# Altium PCB PCB4270Z_A00.PcbDoc (part 3 of 3)
Units mm, origin at the board's own origin, x right, y up, seen from the top; angles counter-clockwise.
Board outline 32 x 51 mm, 4 copper layers (Top Layer, Signal Layer 2, Signal Layer 3, Bottom Layer), stack 1.6 mm thick; 106 components, 90 nets, 404 pads, 564 vias.
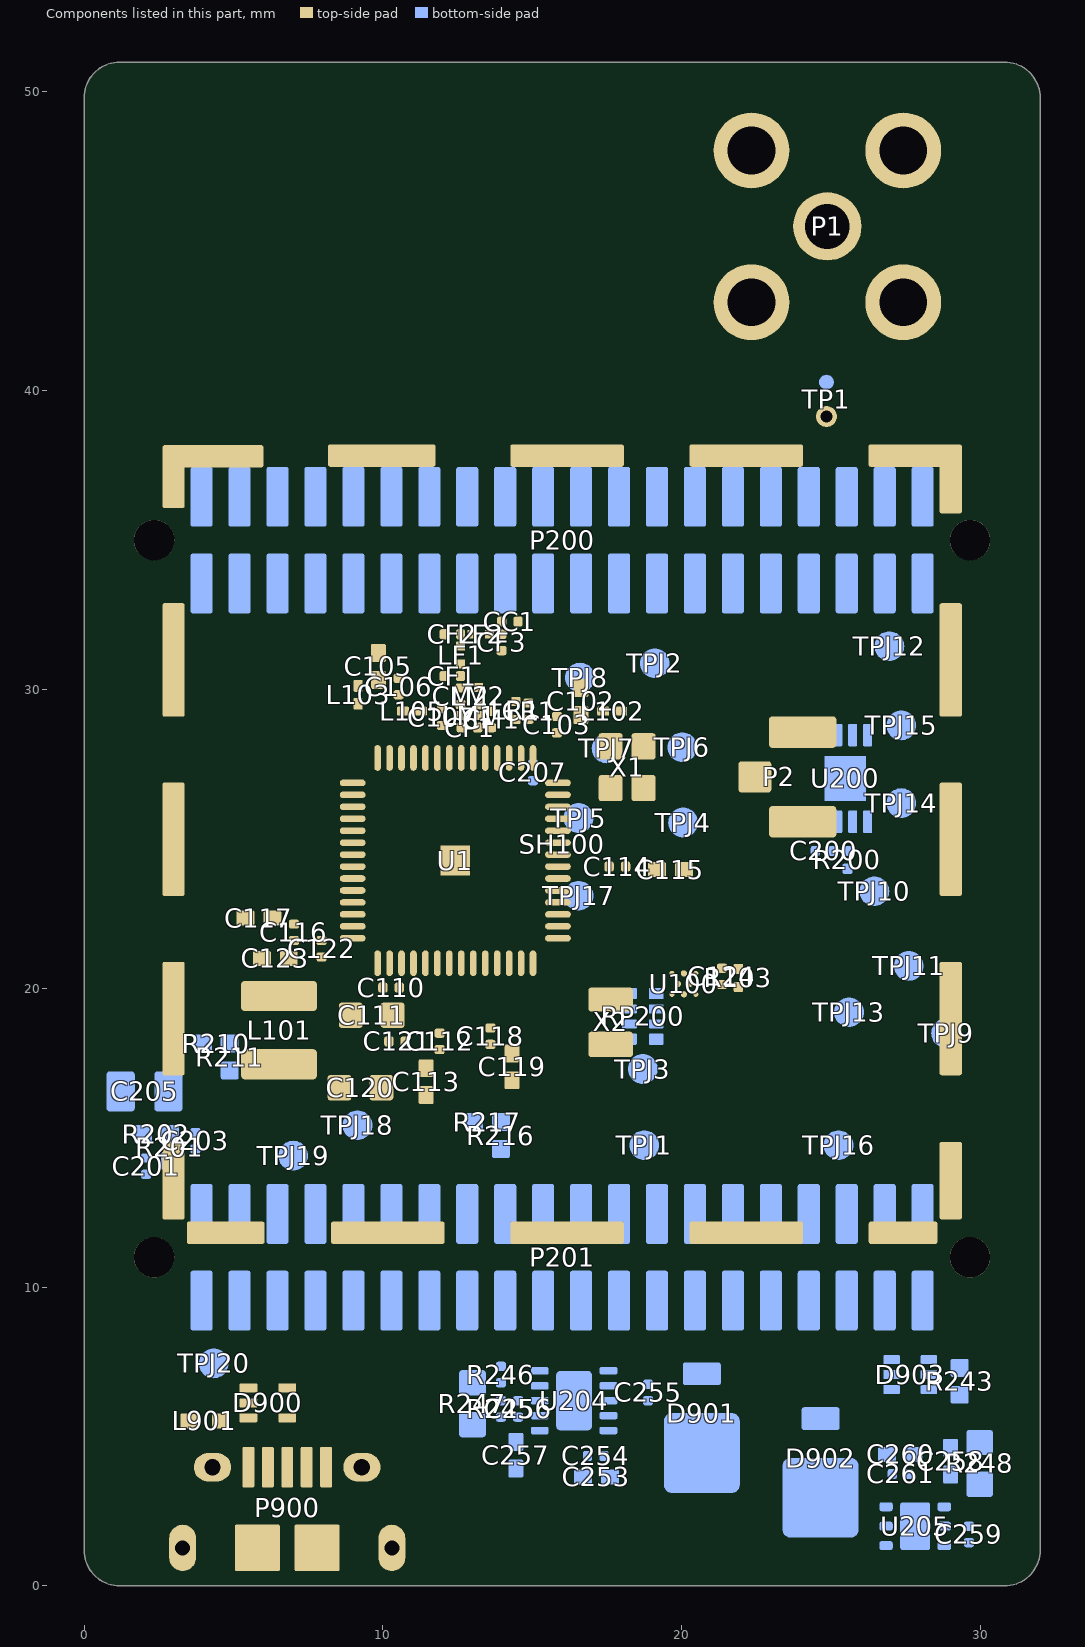
[diagram p5: the components of this part, seen from the top]

## Silkscreen, mask and mechanical layers (free items; w line width, h text height) (continued)
Mechanical 28:
  lines w0.2: -121.4,-34.25 -119.775,-34.25 ; -121.4,12.425 -119.775,12.425 ; -121.4,59.1 -119.775,59.1 ; -66.75,-82.5 -66.75,-80.9 ; -66.75,105.8 -66.75,107.4 ; -13.725,-82.5 -13.725,-80.9 ; -13.725,105.8 -13.725,107.4 ; 39.3,-82.5 39.3,-80.9 ; 39.3,105.8 39.3,107.4 ; 92.325,-82.5 92.325,-80.9 ; 92.325,105.8 92.325,107.4 ; 145.35,-34.225 146.975,-34.225 ; 145.35,59.125 146.975,59.125 ; 146.975,-82.5 -121.4,-82.5 -121.4,107.4 146.975,107.4 146.975,-82.475 ; -119.775,-80.9 145.35,-80.9 145.35,105.8 -119.775,105.8 -119.775,-80.9
  text "5" at -93.1,106.325 h0.5
  text "4" at -40.075,106.3 h0.5
  text "3" at 12.95,106.3 h0.5
  text "2" at 65.975,106.3 h0.5
  text "1" at 118.95,106.3 h0.5
  text "D" at 146.35,82.2 h0.5
  text "D" at -120.4,82.175 h0.5
  text "C" at 146.35,35.5 h0.5
  text "C" at -120.4,35.475 h0.5
  text "B" at 146.35,-11.175 h0.5
  text "B" at -120.4,-11.2 h0.5
  text "A" at 146.35,-57.825 h0.5
  text "A" at -120.4,-57.85 h0.5
  text "5" at -93.1,-81.975 h0.5
  text "4" at -40.075,-82 h0.5
  text "3" at 12.95,-82 h0.5
  text "2" at 65.975,-82 h0.5
  text "1" at 118.95,-82 h0.5
Mechanical 29:
  drawing of 28 lines, arcs and shapes, not listed
  text "Board Title" at -50.175,-55.95 h2.5
  text ".BoardTitle" at -51.575,-61.5 h3.5
  text "Page Title" at -50.175,-65.675 h2.5
  text "Approved:" at -34.125,-69.425 h1.7
  text "Designed:" at -17.925,-69.425 h1.7
  text "Bottom Assembly" at -51.575,-69.575 h3.2
  text "RGU" at -35.5,-71.925 h2.2
  text "TAB" at -19.45,-71.925 h2.2
  text "Revision" at -108.075,-72.7 h1.7
  text "Document number" at -50.175,-72.975 h2.35
  text "BOM Doc. No:" at -22.85,-74.175 h1.7
  text "Size" at -17.925,-74.175 h1.7
  text ".BoardRevision" at -108.339,-75.75 h2.7
  text ".BoardName" at -51.575,-75.85 h3.2
  text "<>" at -23.425,-76.025 h2
  text "A4" at -18.5,-76.025 h2
  text "Sheet" at -108.075,-78.375 h1.7
  text "Sheet Modified Date:" at -78.025,-78.375 h1.7
  text "Sheet Created Date:" at -49.6,-78.375 h1.7
  text "Design Created Date:" at -17.925,-78.375 h1.7
  text "2" at -115.125,-80.325 h1.7
  text "of" at -112.4,-80.325 h1.7
  text "2" at -109.275,-80.325 h1.7
  text "'.Print_Date'" at -79.15,-80.325 h1.7
  text "Monday, July 13, 2020" at -50.725,-80.325 h1.7
  text "Monday, July 13, 2020" at -19,-80.325 h1.7
Mechanical 30:
  lines w0.2: -125.75,-88.975 -125.75,111.5 157.75,111.5 157.75,-88.975 -125.75,-88.975

## Text inside footprints (layer, text, board x,y; h text height)
Designator39: Mechanical 31 ":" at -12.15,177.491 h2.3; Mechanical 31 "side. (CTE: Coefficient of Thermal Expansion)" at -7.635,181.244 h2.3; Mechanical 31 "Vias opened on one side should be plugged only from the other" at -7.728,185.222 h2.3; Mechanical 31 "Materials in compliance with the RoHS and WEEE directives" at -7.7,326.2 h2.3; Mechanical 31 "Glass Epoxy FR-4, NEMA Class 2, UL 94V-0, Tg min 150 C" at -7.7,330.2 h2.3; Mechanical 31 "to the bottom silkscreen. No marking on the boards is allowed!" at -7.7,306.2 h2.3; Mechanical 31 "shall be put in the breakaway areas of the panel frame," at -7.7,310.2 h2.3; Mechanical 31 "All PCB manufacturer's markings (Logo, Week/Year, UL)" at -7.7,314.2 h2.3; Mechanical 31 "(Avoid areas reserved for DataMatrix, Barcodes or Lables)" at -7.7,318.2 h2.3; Mechanical 31 "Logo, Week/Year, UL (ON SECONDARY SIDE (BOT))" at -7.7,322.2 h2.3; Mechanical 31 "IPC-A-600 (current revisions) Class 2, and IPC specifications" at -7.7,302.2 h2.3; Mechanical 31 "refered to by IPC-A-600" at -7.7,298.2 h2.3; Mechanical 31 "otherwise." at -7.7,242.2 h2.3; Mechanical 31 "- Inner radius (contour/outline) 1.2 mm, unless stated" at -7.7,246.2 h2.3; Mechanical 31 "Use of V-CUT test pads is allowed." at -7.7,250.2 h2.3; Mechanical 31 "V-CUT minimum remaining thickness 0.5 +/- 0.1 mm." at -7.7,254.2 h2.3; Mechanical 31 "- If V-CUT, use angle 30 +/- 5 degrees." at -7.7,258.2 h2.3; Mechanical 31 "by manufacturer for QA purposes." at -7.7,262.2 h2.3; Mechanical 31 "- Break-away areas may be used for patterns, holes etc." at -7.7,266.2 h2.3; Mechanical 31 "otherwise use (board manufacturer) standard Build-Up." at -7.7,270.2 h2.3; Mechanical 31 "- If Build-Up (Stack-Up) is specified, follow Build-Up," at -7.7,274.2 h2.3; Mechanical 31 "If applicable, the following requirements are valid:" at -7.7,278.2 h2.3; Mechanical 31 "Gerber files (without alterations)" at -7.7,282.2 h2.3; Mechanical 31 "Use the balancing of the panel that comes with the" at -7.7,286.2 h2.3; Mechanical 31 "outline(s), without written consent/approval." at -7.7,290.2 h2.3; Mechanical 31 "- Copper must not be added or removed from inside the board" at -7.7,294.2 h2.3; Mechanical 31 "(Electroless Nickel/Immersion Gold)" at -7.7,230.2 h2.3; Mechanical 31 "ENIG to meet IPC-4552 requirements (current revision)" at -7.7,234.2 h2.3; Mechanical 31 "Thickness minimum 8 um." at -7.7,214.2 h2.3; Mechanical 31 "to IPC-SM-840 Class T requirements (current revision)" at -7.7,218.2 h2.3; Mechanical 31 "Photo Polymer Wet film" at -7.7,222.2 h2.3; Mechanical 31 "Solder Mask Color: MATTE BLACK" at -7.7,226.2 h2.3; Mechanical 31 "PLUGGED/FILLED, IPC-4761 (current revision) Type IV-b" at -7.7,201.2 h2.3; Mechanical 31 "Plugged and Covered Both Sides, Low CTE non-conductive plugging" at -7.7,197.2 h2.3; Mechanical 31 "material. If Type IV-b is not available as a process, Type IV-a" at -7.7,193.2 h2.3; Mechanical 31 "for the Top Side, and Overprinted (Tented) Bot Side is OK." at -7.7,189.2 h2.3; Mechanical 31 "Min via hole may have more than one pad diameter." at -7.823,153.721 h2.3; Mechanical 31 "Minimum finished via hole diameter   : 0.25 mm (9.8 mils)" at -7.823,157.721 h2.3; Mechanical 31 "Minimum via pad diameter" at -7.823,161.721 h2.3; Mechanical 31 ":" at -11.823,161.721 h2.3; Mechanical 31 "MINIMUM VIA" at -47.823,161.721 h2.3; Mechanical 31 ":" at -11.823,165.721 h2.3; Mechanical 31 "Minimum conductor spacing" at -7.823,165.721 h2.3; Mechanical 31 "Minimum conductor width" at -7.823,169.721 h2.3; Mechanical 31 ":" at -11.823,169.721 h2.3; Mechanical 31 "Cu TRACK(TRACE)" at -47.823,165.721 h2.3; Mechanical 31 "(SPECIFICATION CONTINUED ON NEXT PAGE)" at -47.823,145.721 h2.3; Mechanical 31 "NOMINAL VALUES for Width, Spacing and VIA Diameter:" at -47.823,173.721 h2.3; Mechanical 31 "BOARD THICKNESS" at -47.7,338.2 h2.3; Mechanical 31 "BOARD SIZE" at -47.7,342.2 h2.3; Mechanical 31 "PANEL SIZE" at -47.7,346.2 h2.3; Mechanical 31 "BOARDS pr PANEL" at -47.7,350.2 h2.3; Mechanical 31 "PREPARED BY" at -47.7,354.2 h2.3; Mechanical 31 "-------------------------------------------------------------------------" at -47.7,358.2 h2.3; Mechanical 31 "REVISION" at -47.7,362.2 h2.3; Mechanical 31 "DATE" at -47.7,366.2 h2.3; Mechanical 31 "DOCUMENT/BOARD" at -47.7,374.2 h2.3; Mechanical 31 "PRODUCT OWNER" at -47.7,378.2 h2.3; Mechanical 31 ":" at -11.7,338.2 h2.3; Mechanical 31 ":" at -11.7,294.2 h2.3; Mechanical 31 ":" at -11.7,302.2 h2.3; Mechanical 31 ":" at -11.7,322.2 h2.3; Mechanical 31 ":" at -11.7,330.2 h2.3; Mechanical 31 ":" at -11.7,334.2 h2.3; Mechanical 31 "NO OF LAYERS" at -47.7,334.2 h2.3; Mechanical 31 "MATERIAL(S)" at -47.7,330.2 h2.3; Mechanical 31 "MARKINGS" at -47.7,322.2 h2.3; Mechanical 31 "QUALITY REQ." at -47.7,302.2 h2.3; Mechanical 31 "GENERAL REQ." at -47.7,294.2 h2.3; Mechanical 31 ":" at -11.7,201.2 h2.3; Mechanical 31 ":" at -11.7,226.2 h2.3; Mechanical 31 ":" at -11.7,234.2 h2.3; Mechanical 31 ":" at -11.7,238.2 h2.3; Mechanical 31 "COPPER THK." at -47.7,238.2 h2.3; Mechanical 31 "COPPER PASSIV." at -47.7,234.2 h2.3; Mechanical 31 "RESIST MASK" at -47.7,226.2 h2.3; Mechanical 31 "VIA HOLES" at -47.7,201.2 h2.3; Mechanical 31 "LEGEND/SILKSCR." at -47.823,177.721 h2.3; Mechanical 31 "SEE BUILD-UP" at -7.7,238.2 h2.3; Mechanical 31 "WHITE, BOTH SIDES (TOP + BOT)" at -7.323,177.721 h2.3; Mechanical 31 "4" at -7.7,334.2 h2.3; Mechanical 31 "1.6 mm +/-10%" at -7.7,338.2 h2.3; Mechanical 31 "32.0 x 50.0 mm" at -7.7,342.2 h2.3; Mechanical 31 "210.2 x 205.4 mm" at -7.7,346.2 h2.3; Mechanical 31 "12 (4 x 3)" at -7.7,350.2 h2.3; Mechanical 31 "Tamas Bodi" at -7.7,354.2 h2.3; Mechanical 31 "Silicon Labs" at -7.7,378.2 h2.3; Mechanical 31 "Page 1" at 36.3,138.2 h2.3; Mechanical 31 "Cu TRACK(TRACE)" at -47.823,169.721 h2.3; Mechanical 31 ":" at -11.7,342.2 h2.3; Mechanical 31 ":" at -11.7,346.2 h2.3; Mechanical 31 ":" at -11.7,350.2 h2.3; Mechanical 31 ":" at -11.7,354.2 h2.3; Mechanical 31 ":" at -11.7,362.2 h2.3; Mechanical 31 ":" at -11.7,366.2 h2.3; Mechanical 31 ":" at -11.7,374.2 h2.3; Mechanical 31 ":" at -11.7,378.2 h2.3; Mechanical 31 "<------------------------------------------------------------------------ 1(2)" at -47.7,390.2 h2.3; Mechanical 31 "*** PCB SPECIFICATION FOR BARE BOARD MANUFACTURING ***" at -47.7,386.2 h2.3; Mechanical 31 "-------------------------------------------------------------------------" at -47.7,382.2 h2.3; Mechanical 31 "If needed, removal of thin (less than 0.25mm) solder" at -7.7,210.2 h2.3; Mechanical 31 "resist dams (between QFNand BGA pads) is allowed." at -7.7,205.7 h2.3; Mechanical 31 ": 0.50 mm (20 mils)" at 73.85,161.72 h2.3; Mechanical 31 ": 0.10 mm (4 mils)" at 73.8,165.725 h2.3; Mechanical 31 ": 0.10 mm (4 mils)" at 73.825,169.69 h2.3; Mechanical 32 "NPTH +/− 0.10 mm for d > 5.3 mm" at -47.53,221.72 h2.3; Mechanical 32 "NPTH +/− 0.10 mm for d <= 5.3 mm" at -47.53,225.115 h2.3; Mechanical 32 "PTH +/− 0.20 mm for d > 5.3 mm" at -47.535,228.49 h2.3; Mechanical 32 "PTH +/− 0.15 mm for 2.0 < d <= 5.3 mm" at -47.6,231.795 h2.3; Mechanical 32 "PTH +/− 0.10 mm for d <= 2.0 mm" at -47.565,235.22 h2.3; Mechanical 32 "Nominal tolerances (if no other tolerancces given)" at -47.575,239.355 h2.3; Mechanical 32 "Please follow the gerbers!" at -47.916,203.421 h2.3; Mechanical 32 "L1 =====" at -11.7,370.2 h2.3; Mechanical 32 "TOP ====" at -11.7,378.2 h2.3; Mechanical 32 "| |// PREPREG or CORE ////// 320um *" at 6.3,374.2 h2.3; Mechanical 32 "| |========================= 30-38 um Cu (ca) After plating" at 6.3,378.2 h2.3; Mechanical 32 "/////" at -11.7,374.2 h2.3; Mechanical 32 "| |========================= 11-18 um Cu" at 6.3,370.2 h2.3; Mechanical 32 "| |// PREPREG or CORE ////// **" at 6.3,366.2 h2.3; Mechanical 32 "| |========================= 11-18 um Cu" at 6.3,362.2 h2.3; Mechanical 32 "| |// PREPREG or CORE ////// 320um *" at 6.3,358.2 h2.3; Mechanical 32 "| |========================= 30-38 um Cu (ca) After plating" at 6.3,354.2 h2.3; Mechanical 32 "<------------------------------------------------------------------------ 2(2)" at -47.7,390.2 h2.3; Mechanical 32 "/////" at -11.7,366.2 h2.3; Mechanical 32 "L2 =====" at -11.7,362.2 h2.3; Mechanical 32 "− − −" at -11.7,358.2 h2.3; Mechanical 32 "BOT ====" at -11.7,354.2 h2.3; Mechanical 32 "*)" at -11.7,346.2 h2.3; Mechanical 32 "The distance between Top-L1 and Bottom-L2 should be" at -11.7,342.2 h2.3; Mechanical 32 "as close to 320 um as possible! +/-25um tolerance is allowed." at -11.7,338.2 h2.3; Mechanical 32 "**)" at -11.7,330.2 h2.3; Mechanical 32 "Select Center Prepreg thickness in order to reach specified" at -11.7,326.2 h2.3; Mechanical 32 "board thickness" at -11.7,322.2 h2.3; Mechanical 32 "100% Electrical Test" at -7.7,310.2 h2.3; Mechanical 32 "Optical test, AOI (with automatic scanner)" at -7.7,306.2 h2.3; Mechanical 32 "Visual inspection" at -7.7,302.2 h2.3; Mechanical 32 "(Generate netlist from Gerber and Drill files)" at -7.7,298.2 h2.3; Mechanical 32 "Avoid use of 2125 Prepreg" at -7.7,290.2 h2.3; Mechanical 32 "--------------------------------------------------------------------------------" at -47.7,275.225 h2.3; Mechanical 32 "NC DRILL - HOLE INFORMATION:" at -47.7,271.667 h2.3; Mechanical 32 "Drill dimensions must be taken from the Excellon (.DRL) file(s), and" at -23.7,267.225 h2.3; Mechanical 32 "the drill report file(s) (.DRR)." at -23.7,263.225 h2.3; Mechanical 32 "NON-PLATED holes may have a small center marker in the Gerber files." at -23.7,259.225 h2.3; Mechanical 32 "Under no circumstance must these Gerber flashes be mistaken for the" at -23.7,255.225 h2.3; Mechanical 32 "hole drill dimensions!" at -23.7,251.225 h2.3; Mechanical 32 "The drill data may contain slots (in a separate file)." at -47.7,247.225 h2.3; Mechanical 32 "Dimensions for the finished board (after plating)." at -47.575,243.195 h2.3; Mechanical 32 "--------------------------------------------------------------------------------" at -47.965,189.28 h2.3; Mechanical 32 "--------------------------------------------------------------------------------" at -47.741,218.267 h2.3; Mechanical 32 "BUILD UP" at -47.7,382.2 h2.3; Mechanical 32 ":" at -11.7,382.2 h2.3; Mechanical 32 ":" at -11.7,310.2 h2.3; Mechanical 32 "TEST" at -47.7,310.2 h2.3; Mechanical 32 "WARNING" at -47.7,267.225 h2.3; Mechanical 32 ":" at -27.7,267.225 h2.3; Mechanical 32 "Page 2" at 36.3,138.2 h2.3; Mechanical 32 "The board may contain a special testpoint on the bottom layer with an exposed" at -47.856,211.633 h2.3; Mechanical 32 "ground copper ring around the testpoint. This exposed copper ring is intentional." at -47.801,207.469 h2.3; Mechanical 32 "Fiducials could also have different solrder mask size/shape exposing or covering" at -47.856,196.163 h2.3; Mechanical 32 "the surrounding copper. Please follow the gerbers for those as well!" at -47.846,192.613 h2.3
P200: Mechanical 12 "2" at 3.783,36.118 h0.4 r180; Mechanical 12 "1" at 3.884,34.086 h0.4 r180; Mechanical 12 "40" at 27.659,36.067 h0.4 r180; Bottom Overlay "1" at 3,32.8 h1.25; Bottom Overlay "40" at 29.8,36.8 h1.25
P201: Mechanical 12 "40" at 27.659,12.067 h0.4 r180; Mechanical 12 "1" at 3.884,10.086 h0.4 r180; Mechanical 12 "2" at 3.783,12.118 h0.4 r180; Bottom Overlay "40" at 29.8,12.8 h1.25; Bottom Overlay "1" at 3.2,8.8 h1.25
P900: Mechanical 15 "PCB EDGE" at 5.505,-0.35 h0.4